# Altium PCB main.PcbDoc
Units mil, origin at the board's own origin, x right, y up, seen from the top; angles counter-clockwise.
Board outline 3110.27 x 3307.12 mil, 2 copper layers (Top Layer, Bottom Layer); 85 components, 80 nets, 350 pads, 74 vias.
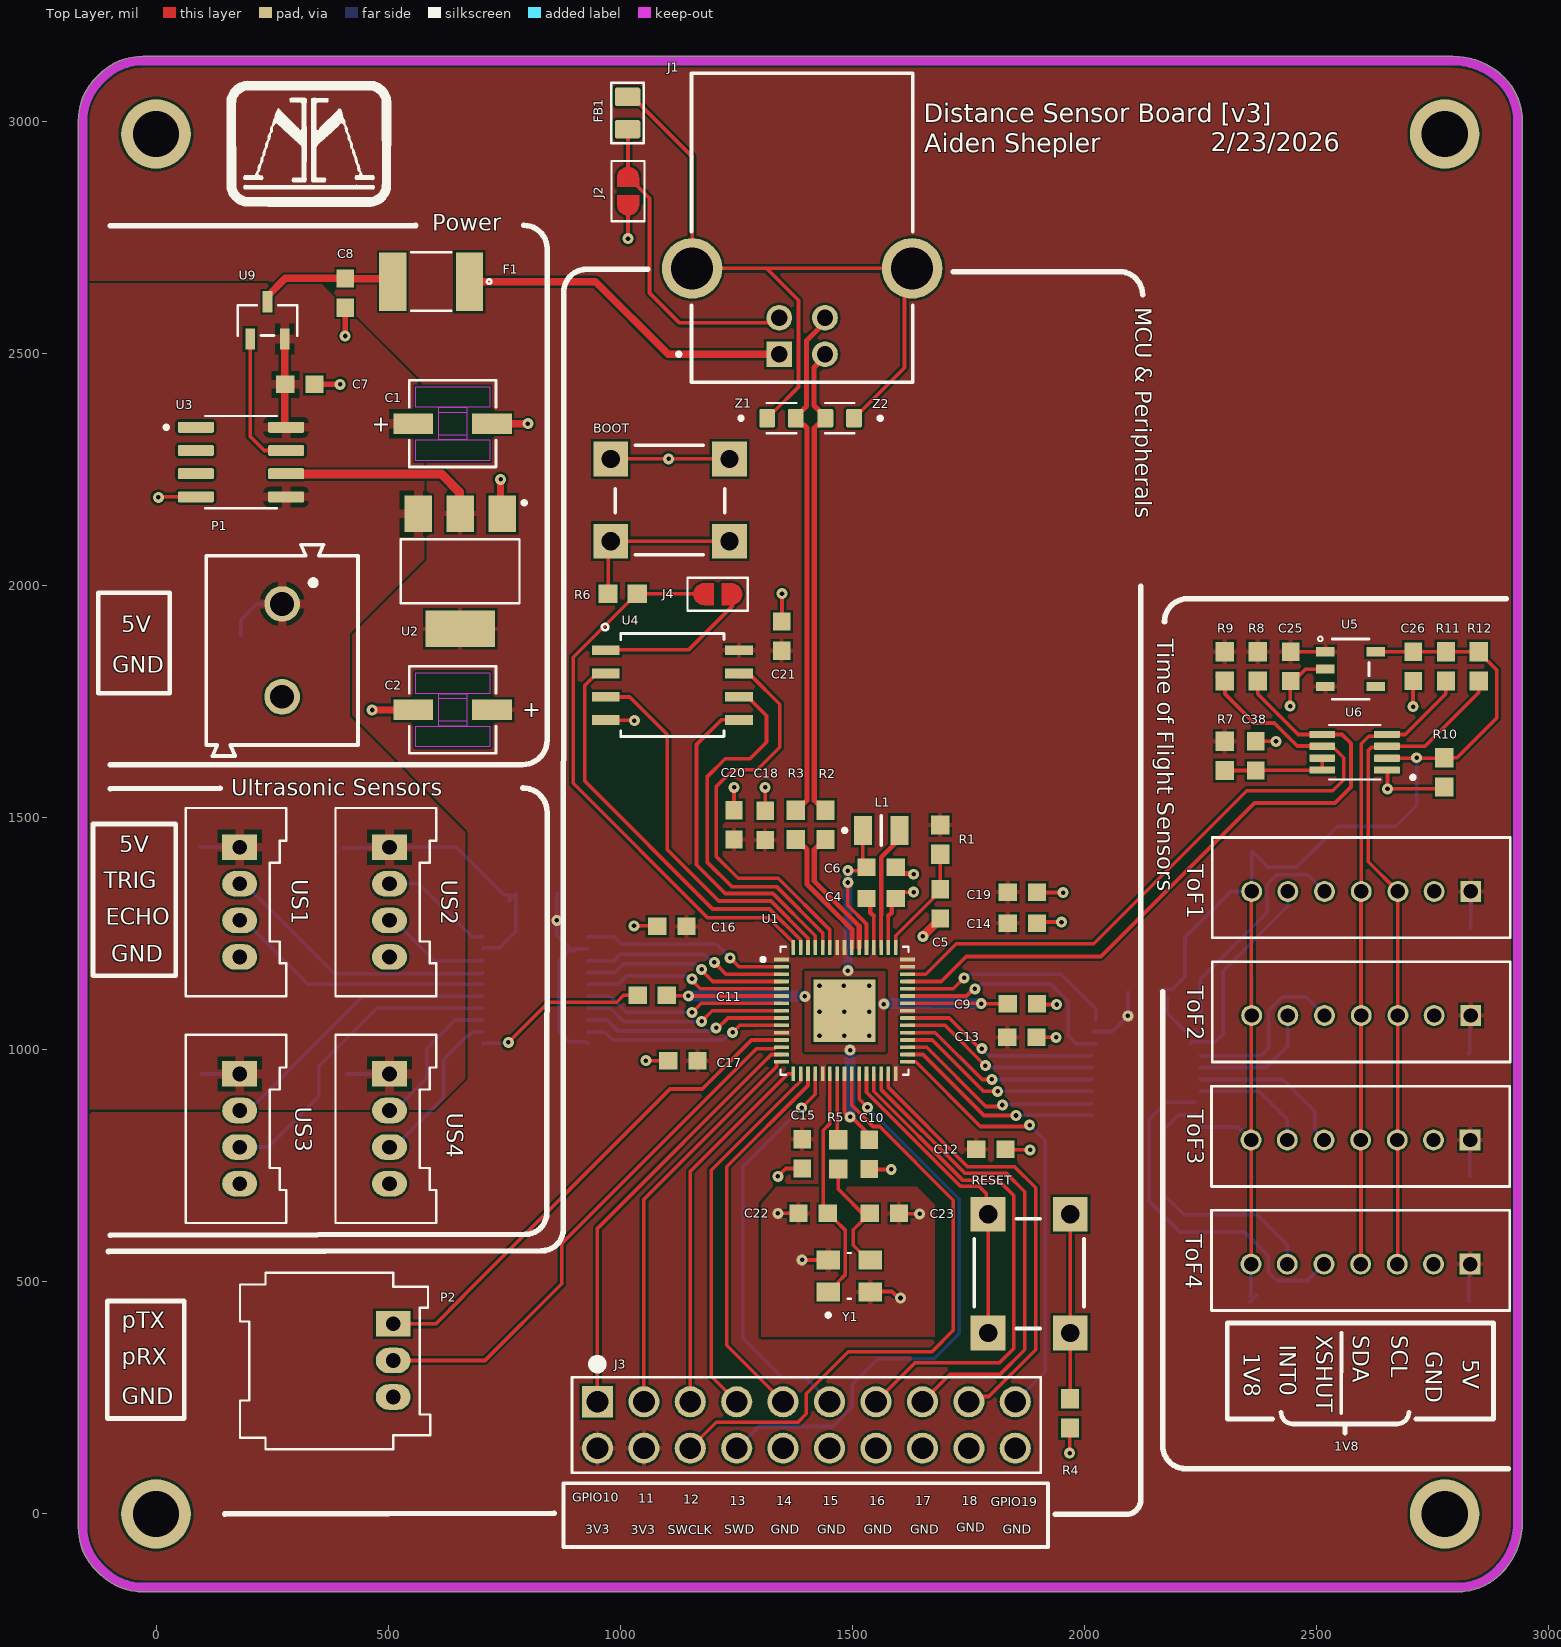
[diagram p0: Top Layer view]
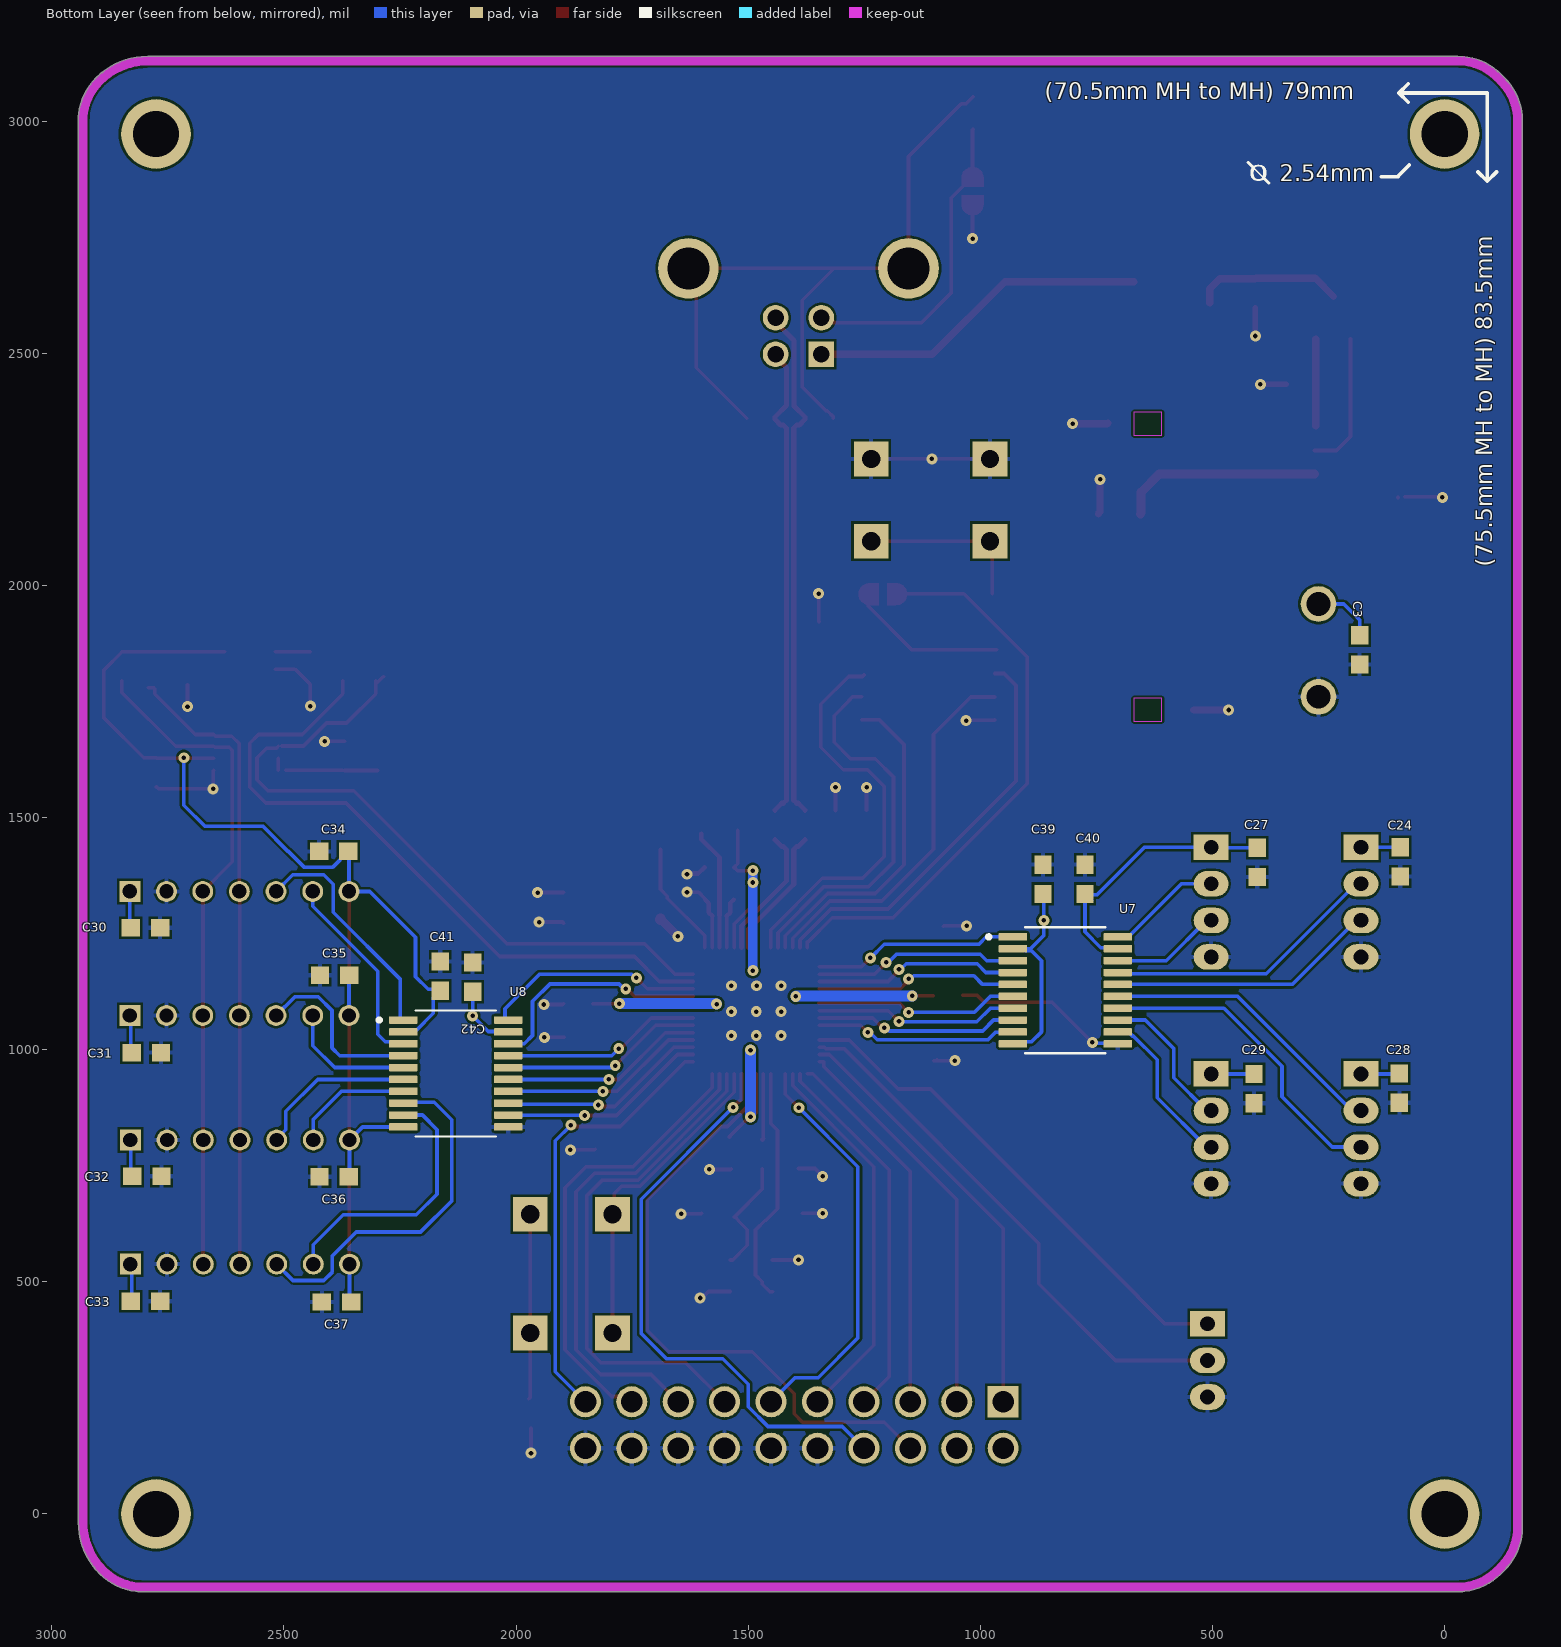
[diagram p1: Bottom Layer view, seen from below]

## Layer stack, top to bottom
Top Solder: solder mask 0.4, Solder Resist, Dk 3.5
Top Layer: signal copper 1.4
Dielectric 1: dielectric 12.6, FR-4, Dk 4.8
Bottom Layer: signal copper 1.4
Bottom Solder: solder mask 0.4, Solder Resist, Dk 3.5

## Board outline
-129.1,-121.07 cw(c-36.77,-28.74) -167.34,-28.74 -167.34,3001.18 cw(c-36.77,3001.18) -129.1,3093.51 -121.07,3101.54 cw(c-28.74,3009.21) -28.74,3139.78 2792.98,3139.78 cw(c2792.98,2981.8) 2904.69,3093.51 cw(c2812.36,3001.18) 2942.11,3015.73 2942.93,3011.81 2942.93,-17.38 cw(c2784.95,-17.38) 2896.66,-129.1 cw(c2804.33,-36.77) 2818.88,-166.52 2814.96,-167.34 -39.37,-167.34 -43.29,-166.52 cw(c-28.74,-36.77) -121.07,-129.1

## Design rules (kind name [scope] priority, off if disabled: settings)
Clearance [All] p1: gap=4.92 ignorepadtopadclearanceinfootprint=FALSE
DiffPairsRouting [All] p1: maxlimit=5 minlimit=5 mostfreqgap=5 toplayer_minwidth=7.87 toplayer_maxwidth=10.91 toplayer_prefwidth=10.91 bottomlayer_minwidth=7.87 bottomlayer_maxwidth=10.91 bottomlayer_prefwidth=10.91 impedanceprofiledriven=TRUE impedanceprofileid={42F0FB0B-BD3A-4B47-9FD5-915A8C1A7547} impedanceprofilevalue=90.000000 maxuncoupledlength=500
MinimumSolderMaskSliver [All] p1: minsoldermaskwidth=4.92
PlaneClearance [InNet('NetFB1_1')] p1: clearance=4.92
PlaneClearance PlaneClearance_1 [All] p2: clearance=4.92
PolygonConnect Polygon_5V_Connect [IsNamedPolygon('T.5V')] p1: connectstyle=Relief reliefconductorwidth=19.68 reliefentries=4 polygonreliefangle="90 Angle" airgapwidth=10
PolygonConnect Polygon_1V1-2_Connect_Direct [IsNamedPolygon('T.1V1-2')] p2: connectstyle=Direct reliefconductorwidth=10 reliefentries=4 polygonreliefangle="90 Angle" airgapwidth=10
PolygonConnect Polygon_3V3-1_Connect_Direct [IsNamedPolygon('T.3V3-1')] p3: connectstyle=Direct reliefconductorwidth=10 reliefentries=4 polygonreliefangle="90 Angle" airgapwidth=10
PolygonConnect Polygon_3V3-2/GND-12/1V1-1_Connect_Relief90 [IsNamedPolygon('T.1V1-1') or IsNamedPolygon('T.GND-1') or IsNamedPolygon('B.GND-1') or IsNamedPolygon('T.3V3-2') vs (IsThruPin or IsSMTPin or IsPad or IsComponentPad)] p4: connectstyle=Relief reliefconductorwidth=10 reliefentries=4 polygonreliefangle="90 Angle" airgapwidth=4.92
PolygonConnect Polygon_3V3-2/GND-12/1V1-1_Connect_Direct [IsNamedPolygon('T.1V1-1') or IsNamedPolygon('T.GND-1') or IsNamedPolygon('T.3V3-2') or IsNamedPolygon('B.GND-1') vs IsVia] p5: connectstyle=Direct reliefconductorwidth=10 reliefentries=4 polygonreliefangle="90 Angle" airgapwidth=10
RoutingVias [All] p1: holewidth=28 width=50 viastyle="Through Hole" minholewidth=7.87 minwidth=13.78 maxholewidth=28 maxwidth=50
SilkToSilkClearance [All] p1: silktosilkclearance=4.92
SilkToSolderMaskClearance [IsPad] p1: minsilkscreentomaskgap=4.92 clearancetoexposedcopper=TRUE
SolderMaskExpansion [All] p1: expansion=4 istentingtop=FALSE
SupplyNets "Schematic Supply Nets_4" [InNet('1V1')] p1: voltage=0.000
SupplyNets "Schematic Supply Nets_3" [InNet('1V8')] p2: voltage=0.000
SupplyNets "Schematic Supply Nets_2" [InNet('5V')] p3: voltage=0.000
SupplyNets "Schematic Supply Nets_1" [InNet('GND')] p4: voltage=0.000
SupplyNets "Schematic Supply Nets" [InNet('3V3')] p5: voltage=0.000
Width [All] p1: maxlimit=23.62 minlimit=7.87 preferedwidth=7.87
25 further rules are at their usual default settings.

## Classes and differential pairs
component class MCU: ` BOOT C1 C2 C3 C4 C5 C6 C7 C8 C9 C10 C11 C12 C13 C14 C15 C16 C17 C18 C19 C20 C21 C22 C23 F1 FB1 J1 J2 J3 J4 L1 P1 P2 R1 R2 R3 R4 R5 R6 RESET U1 U2 U3 U4 U9 Y1 Z1 Z2
component class Distance-Sensors: C24 C25 C26 C27 C28 C29 C30 C31 C32 C33 C34 C35 C36 C37 C38 C39 C40 C41 C42 R7 R8 R9 R10 R11 R12 ToF1 ToF2 ToF3 ToF4 U5 U6 U7 U8 US1 US2 US3 US4
differential pair DX: +DX_P -DX_N
differential pair D: +D_P -D_N

## Components (designator, comment, footprint, x,y, rotation, side; value= is the part's Value field where it differs from the comment)
BOOT "BOOT" SPST-PUSH-BUTTON 1107.28,2184.06 r90 top (schematic designator B2)
C1 "10uF" RADIAL_CAN_CAP_4_X_5.8_SMD 639.13,2348.43 r0 top
C2 "10uF" RADIAL_CAN_CAP_4_X_5.8_SMD 639.13,1732.28 r180 top
C3 "Cap" CAPC0603 183.07,1861.22 r270 bottom value=100nF
C4 "Cap" CAPC0603 1562.01,1325.79 r0 top value=4.7uF
C5 "Cap" CAPC0603 1688.98,1313.98 r270 top value=4.7uF
C6 "Cap" CAPC0603 1562.01,1392.72 r0 top value=4.7uF
C7 "Cap" CAPC0603 310.04,2433.07 r0 top value=100nF
C8 "Cap" CAPC0603 407.48,2629.92 r90 top value=100nF
C9 "Cap" CAPC0603 1866.14,1099.41 r0 top value=100nF
C10 "Cap" CAPC0603 1536.42,774.61 r270 top value=4.7uF
C11 "Cap" CAPC0603 1068.9,1117.13 r180 top value=100nF
C12 "Cap" CAPC0603 1798.23,785.43 r0 top value=100nF
C13 "Cap" CAPC0603 1865.16,1026.57 r0 top value=100nF
C14 "Cap" CAPC0603 1866.14,1272.64 r0 top value=100nF
C15 "Cap" CAPC0603 1391.73,775.59 r270 top value=100nF
C16 "Cap" CAPC0603 1111.22,1265.75 r180 top value=100nF
C17 "Cap" CAPC0603 1134.84,976.38 r180 top value=100nF
C18 "Cap" CAPC0603 1312.01,1483.27 r90 top value=100nF
C19 "Cap" CAPC0603 1866.14,1339.57 r0 top value=100nF
C20 "Cap" CAPC0603 1245.08,1484.25 r90 top value=100nF
C21 "Cap" CAPC0603 1347.44,1890.75 r90 top value=100nF
C22 "Cap" CAPC0603 1415.35,647.64 r180 top value=15pF
C23 "Cap" CAPC0603 1568.9,647.64 r0 top value=15pF
C24 "Cap" CAPC0603 95.47,1404.53 r270 bottom value=100nF
C25 "Cap" CAPC0603 2443.9,1825.79 r270 top value=1uF
C26 "Cap" CAPC0603 2707.68,1825.79 r270 top value=1uF
C27 "Cap" CAPC0603 403.54,1403.54 r270 bottom value=100nF
C28 "Cap" CAPC0603 97.44,917.32 r270 bottom value=100nF
C29 "Cap" CAPC0603 410.43,916.34 r270 bottom value=100nF
C30 "Cap" CAPC0603 2798.23,1262.8 r180 bottom value=100nF
C31 "Cap" CAPC0603 2796.5,993.66 r180 bottom value=100nF
C32 "Cap" CAPC0603 2795.28,727.36 r180 bottom value=100nF
C33 "Cap" CAPC0603 2798.23,458.23 r180 bottom value=100nF
C34 "Cap" CAPC0603 2392.72,1427.17 r0 bottom value=100nF
C35 "Cap" CAPC0603 2390.75,1160.43 r0 bottom value=100nF
C36 "Cap" CAPC0603 2391.73,726.38 r0 bottom value=100nF
C37 "Cap" CAPC0603 2386.81,456.69 r0 bottom value=100nF
C38 "Cap" CAPC0603 2369.09,1632.87 r90 top value=100pF
C39 "Cap" CAPC0603 865.16,1367.13 r270 bottom value=100nF
C40 "Cap" CAPC0603 774.61,1367.13 r90 bottom value=100nF
C41 "Cap" CAPC0603 2163.39,1158.46 r270 bottom value=100nF
C42 "Cap" CAPC0603 2093.5,1156.5 r270 bottom value=100nF
F1 "MF-MSMF050-2" FUSM4632X85 592.52,2654.53 r180 top
FB1 "MH2029-300Y" L0805 1015.75,3017.72 r270 top
J1 "USB-B" SAMTEC_USB-B-S-X-X-TH 1391.73,2683.07 r180 top
J2 "Thru-Hole Jumper" "[Jumper] Solderable Jumper" 1016.73,2849.41 r270 top
J3 "[Connector] 879142016" "[Connector] CONN20" 950.79,241.73 r0 top
J4 "Thru-Hole Jumper" "[Jumper] Solderable Jumper" 1209.84,1981.3 r0 top
L1 "3.3uH" 2016_SMD_Inductor 1562.01,1472.44 r0 top
P1 "2 port screw" "[CONNECTOR] 5MM_2PORT_SCREW" 271.65,1860.24 r270 top
P2 "UART" MOLEX-HDR-1X3-SHERLOCK-RA 510.83,409.45 r90 top
R1 "Res" RES0603 1688.98,1452.76 r270 top value=33
R2 "Res" RES0603 1441.93,1484.25 r270 top value=27
R3 "Res" RES0603 1377.95,1484.25 r270 top value=27
R4 "Res" RES0603 1968.5,216.54 r90 top value=1k
R5 "Res" RES0603 1469.49,774.61 r90 top value=1k
R6 "Res" RES0603 1004.92,1982.28 r0 top value=1k
R7 "Res" RES0603 2302.17,1632.87 r270 top value=200k
R8 "Res" RES0603 2373.03,1825.79 r270 top value=1k
R9 "Res" RES0603 2302.17,1825.79 r270 top value=1k
R10 "Res" RES0603 2774.61,1597.44 r270 top value=300k
R11 "Res" RES0603 2778.54,1825.79 r270 top value=1k
R12 "Res" RES0603 2849.41,1825.79 r270 top value=1k
RESET "BOOT" SPST-PUSH-BUTTON 1880.91,517.72 r0 top (schematic designator B1)
ToF1 "ToF 1" 7POS_2MM_CONN 2831.99,1340.98 r0 top
ToF2 "ToF 2" 7POS_2MM_CONN 2831.99,1073.62 r0 top
ToF3 "ToF 3" 7POS_2MM_CONN 2830.7,805.55 r0 top
ToF4 "ToF 4" 7POS_2MM_CONN 2830.7,538.19 r0 top
U1 "[MCU] RP2350" QFN40P700X700X90-61N 1483.06,1084.09 r0 top
U2 "NCP1117LPST33T3G" SOT230P700X175-4N 655.15,2030.51 r270 top
U3 "LMV358IDR" SOIC-8 183.07,2265.75 r0 top
U4 "W25Q128JVSIQ TR" SOIC_208MIL_WIN 1112.2,1785.43 r0 top
U5 "ADPL40502AUJZ-1.8-R7" TSOT-23-5_UJ-5_ADI 2572.95,1819.88 r0 top
U6 "PCA9306DCTR" SOP65P400X130-8N 2581.69,1640.75 r180 top
U7 "[IC] TXS0108EQPWRQ1" SOP65P640X120-20N 816.93,1127.95 r180 bottom
U8 "[IC] TXS0108EQPWRQ1" SOP65P640X120-20N 2129.92,948.82 r180 bottom
U9 "PMV48XP,215" SOT23_NEX 240.16,2570.87 r0 top
US1 "USS1" MOLEX-HDR-1X4-SHERLOCK-VERT 180.12,1436.02 r90 top
US2 "USS2" MOLEX-HDR-1X4-SHERLOCK-VERT 502.95,1436.02 r90 top
US3 "USS3" MOLEX-HDR-1X4-SHERLOCK-VERT 180.12,947.84 r90 top
US4 "USS4" MOLEX-HDR-1X4-SHERLOCK-VERT 502.95,947.84 r90 top
Y1 "ABM8-272-T3" XTAL_ABM8-272-T3 1493.11,512.8 r90 top
Z1 "VAR" VARC1608X56N 1347.24,2360.24 r0 top
Z2 "VAR" VARC1608X56N 1472.64,2360.24 r180 top

## Footprints (in the part's own frame and the unit in brackets; to place one, negate y for a bottom-side part, rotate by r counter-clockwise, add the part's x,y. Pads: shape width x height; smd on the part's side, far side on the other; paste and mask are expansions set on the pad)
7POS_2MM_CONN [mil]
  rect 45x45 / inner round 45 / far side rect 45x45 hole 31: 1(0,0)
  round 45 hole 31: 2(-79,0) 3(-157,0) 4(-236,0) 5(-315,0) 6(-394,0) 7(-472,0)
  silkscreen extent -557,-100 85,116, body extent -556,-100 86,118, height 337
2016_SMD_Inductor [mm] "0806 (2016 Metric)"
  rect 1x1.6 smd: 1(-1,0) 2(1,0)
  silkscreen extent -2.1,-0.8 0,0.8, body extent -1,-0.8 1,0.8, height 0.95
"[CONNECTOR] 5MM_2PORT_SCREW" [mm] "5.08 mm pitch 2 port screw terminal / 691213510002"
  round 1.95 hole 1.3: 1(-2.54,0) 2(2.54,0)
  silkscreen extent -5.78,-4.15 5.78,4.15, body extent -5.68,-4.04 5.68,4.06, height 10
"[Connector] CONN20" [mil]
  rect 67x67 / inner round 67 / far side rect 67x67 hole 47: 1(0,0)
  round 67 hole 47: 2(0,-100) 3(100,0) 4(100,-100) 5(200,0) 6(200,-100) 7(300,0) 8(300,-100) 9(400,0) 10(400,-100) 11(500,0) 12(500,-100) 13(600,0) 14(600,-100) 15(700,0) 16(700,-100) 17(800,0) 18(800,-100) 19(900,0) 20(900,-100)
  silkscreen extent -55,-153 955,91, body extent -50,-151 950,45, height 325
"[Jumper] Solderable Jumper" [mil]
  round 1 smd: 1(-30.71,0) 2(30.71,0)
  Top Layer region: 8.9,-23.62 8.9,23.62 28.9,23.62 28.9,23.62 39.15,21.28 47.37,14.73 51.93,5.26 51.93,-5.26 47.37,-14.73 39.15,-21.28 28.9,-23.62 28.9,-23.62
  Top Layer region: -8.9,-23.62 -8.9,23.62 -28.9,23.62 -28.9,23.62 -39.15,21.28 -47.37,14.73 -51.93,5.26 -51.93,-5.26 -47.37,-14.73 -39.15,-21.28 -28.9,-23.62 -28.9,-23.62
  silkscreen extent -65,-35 65,35
CAPC0603 [mm] "Chip Capacitor, 2-Leads, Body 1.60x0.80mm, IPC Medium Density"
  rect 1x0.95 smd: 1(-0.8,0) 2(0.8,0)
  body extent -0.88,-0.48 0.87,0.48, height 0.8
FUSM4632X85 [mm]
  rect 1.5x3.2 smd: 1(-2.1,0) 2(2.1,0)
  silkscreen extent -3.3,-1.6 1.1,1.6, body extent -2.27,-1.62 2.27,1.62, height 1.1
L0805 [mil]
  rrect25% 40x55 smd: 1(-35,0) 2(35,0)
  silkscreen extent -65,-35 65,35, body extent -39,-24 39,24, height 43
MOLEX-HDR-1X3-SHERLOCK-RA [mm]
  rect 1.397x1.905 hole 0.8: 1(0,0)
  oval 1.397x1.905 hole 0.8: 2(-2,0) 3(-4,0)
  silkscreen extent -6.86,-2.03 2.79,8.38, body extent -6.88,-1.99 2.82,8.51, height 5.75
MOLEX-HDR-1X4-SHERLOCK-VERT [mm]
  rect 1.397x1.905 hole 0.8: 1(0,0)
  oval 1.397x1.905 hole 0.8: 2(-2,0) 3(-4,0) 4(-6,0)
  silkscreen extent -8.15,-2.55 2.15,2.95, body extent -8.13,-2.57 2.17,2.98, height 8.5
QFN40P700X700X90-61N [mm] "RP2350"
  rrect25% 0.81x0.2 smd paste+0 mask+0.102: 1(-3.45,2.8) 2(-3.45,2.4) 3(-3.45,2) 4(-3.45,1.6) 5(-3.45,1.2) 6(-3.45,0.8) 7(-3.45,0.4) 8(-3.45,0) 9(-3.45,-0.4) 10(-3.45,-0.8) 11(-3.45,-1.2) 12(-3.45,-1.6) 13(-3.45,-2) 14(-3.45,-2.4) 15(-3.45,-2.8) 31(3.45,-2.8) 32(3.45,-2.4) 33(3.45,-2) 34(3.45,-1.6) 35(3.45,-1.2) 36(3.45,-0.8) 37(3.45,-0.4) 38(3.45,0) 39(3.45,0.4) 40(3.45,0.8) 41(3.45,1.2) 42(3.45,1.6) 43(3.45,2) 44(3.45,2.4) 45(3.45,2.8)
  rrect25% 0.2x0.81 smd paste+0 mask+0.102: 16(-2.8,-3.45) 17(-2.4,-3.45) 18(-2,-3.45) 19(-1.6,-3.45) 20(-1.2,-3.45) 21(-0.8,-3.45) 22(-0.4,-3.45) 23(0,-3.45) 24(0.4,-3.45) 25(0.8,-3.45) 26(1.2,-3.45) 27(1.6,-3.45) 28(2,-3.45) 29(2.4,-3.45) 30(2.8,-3.45) 46(2.8,3.45) 47(2.4,3.45) 48(2,3.45) 49(1.6,3.45) 50(1.2,3.45) 51(0.8,3.45) 52(0.4,3.45) 53(0,3.45) 54(-0.4,3.45) 55(-0.8,3.45) 56(-1.2,3.45) 57(-1.6,3.45) 58(-2,3.45) 59(-2.4,3.45) 60(-2.8,3.45)
  rect 3.4x3.4 smd paste-0.62 mask+0.102: 61(0,0)
  silkscreen extent -4.56,-3.5 3.5,3.5, body extent -3.55,-3.55 3.55,3.55, height 0.96
RADIAL_CAN_CAP_4_X_5.8_SMD [mil]
  rect 86x45 smd paste+0 mask+0: 1(-85,0) 2(85,0)
  Top Layer keep-out region: -30,-35 -30,35 30,35 30,-35
  Top Layer keep-out region: -80,-80 -80,-35 80,-35 80,-80
  Top Layer keep-out region: -80,35 -80,80 80,80 80,35
  Keep-Out Layer region: -30,-24.5 -30,24.5 30,24.5 30,-24.5
  silkscreen extent -94,-94 94,94, body extent -108,-89 108,89, height 242
RES0603 [mm] "Chip Resistor, 2-Leads, Body 1.60x0.80mm, IPC Medium Density"
  rect 1.05x1 smd: 1(-0.8,0) 2(0.8,0)
  body extent -0.88,-0.48 0.87,0.47, height 0.8
SAMTEC_USB-B-S-X-X-TH [mm]
  rect 1.408x1.408 / inner round 1.408 / far side rect 1.408x1.408 hole 0.9: 1(1.25,4.7)
  round 1.408 hole 0.9: 2(-1.25,4.7) 3(-1.25,2.7) 4(1.25,2.7)
  round 3.316 hole 2.3: S1(-6.02,0) S2(6.02,0)
  silkscreen extent -6.05,-10.67 6.85,6.22, body extent -7.25,-10.39 7.25,6.11, height 10.7
SOIC-8 [mm] "127P599X175-8N"
  rrect25% 1.97x0.6 smd: 1(-2.47,1.905) 2(-2.47,0.635) 3(-2.47,-0.635) 4(-2.47,-1.905) 5(2.47,-1.905) 6(2.47,-0.635) 7(2.47,0.635) 8(2.47,1.905)
  silkscreen extent -4.19,-2.52 1.95,2.52, body extent -3,-2.45 3,2.45, height 1.75
SOIC_208MIL_WIN [mil]
  rect 60x21 smd paste+0 mask+0: 1(-143.5,75) 2(-143.5,25) 3(-143.5,-25) 4(-143.5,-75) 5(143.5,-75) 6(143.5,-25) 7(143.5,25) 8(143.5,75)
  silkscreen extent -152,-111 111,132, body extent -159,-106 159,106, height 85
SOP65P400X130-8N [mm]
  rrect25% 1.42x0.4 smd: 1(-1.77,0.975) 2(-1.77,0.325) 3(-1.77,-0.325) 4(-1.77,-0.975) 5(1.77,-0.975) 6(1.77,-0.325) 7(1.77,0.325) 8(1.77,0.975)
  silkscreen extent -3.29,-1.5 1.4,1.5, body extent -2,-1.47 2,1.47, height 1.3
SOP65P640X120-20N [mm]
  rrect25% 1.57x0.41 smd: 1(-2.87,2.925) 2(-2.87,2.275) 3(-2.87,1.625) 4(-2.87,0.975) 5(-2.87,0.325) 6(-2.87,-0.325) 7(-2.87,-0.975) 8(-2.87,-1.625) 9(-2.87,-2.275) 10(-2.87,-2.925) 11(2.87,-2.925) 12(2.87,-2.275) 13(2.87,-1.625) 14(2.87,-0.975) 15(2.87,-0.325) 16(2.87,0.325) 17(2.87,0.975) 18(2.87,1.625) 19(2.87,2.275) 20(2.87,2.925)
  silkscreen extent -4.29,-3.45 2.2,3.45, body extent -3.2,-3.25 3.2,3.25, height 1.2
SOT23_NEX [mil] "TO-236 (PMOS)"
  rect 21x46 smd paste+0 mask+0: 1(-37.4,-40) 2(37.4,-40) 3(0,40)
  silkscreen extent -64,-32 64,32, body extent -59,-49 59,49, height 43
SOT230P700X175-4N [mm]
  rect 2x1.5 smd: 1(-3.15,2.3) 2(-3.15,0) 3(-3.15,-2.3)
  rect 2x3.8 smd: 4(3.15,0)
  silkscreen extent -3.85,-3.25 1.75,3.6, body extent -3.5,-3.25 3.5,3.25, height 1.8
SPST-PUSH-BUTTON [mm] "1825910-6"
  rect 1.9x1.9 hole 1: 1(2.25,3.25) 2(2.25,-3.25) 3(-2.25,-3.25) 4(-2.25,3.25)
  silkscreen extent -3,-3 3,3, body extent -3,-4 2.99,3.8, height 5.11
TSOT-23-5_UJ-5_ADI [mil] "SOT23_5, Thin"
  rect 39.5x20 smd paste+0 mask+0: 1(-54.25,37.4) 2(-54.25,0) 3(-54.25,-37.4) 4(54.25,-37.4) 5(54.25,37.4)
  silkscreen extent -70,-65 40,70, body extent -60,-60 60,60, height 39
VARC1608X56N [mm]
  rrect25% 0.87x1.02 smd: 1(-0.78,0) 2(0.78,0)
  silkscreen extent -2.31,-0.83 0.8,0.83, body extent -0.8,-0.4 0.8,0.4, height 0.33
XTAL_ABM8-272-T3 [mm]
  rect 1.05x1.3 smd: 1(-0.875,1.15) 2(-0.875,-1.15) 3(0.875,-1.15) 4(0.875,1.15)
  silkscreen extent -2.24,-0.09 1.25,1.25, body extent -1.25,-1.6 1.25,1.6, height 0.7

## Part data
BOOT RESET: library part 1825910-6, "SWITCH TACTILE SPST-NO 0.05A 24V", Contact Current Rating=50mA, Contact Resistance=100mR, Manufacturer="TE Connectivity Alcoswitch", Max Operating Temperature=85°C, Max Voltage Rating (DC)=24V, Min Operating Temperature=-35°C, Operating Force=160gf, Package Quantity=750, Supplier Part Number 1=450-1650-ND, Actuator Length=0.055inch, Actuator Material=PBT, Actuator Type=Standard, Category="Pushbutton Switches", ComponentLink1Description=https://datasheet.ciiva.com/30199/1825910-6rqpn1825910-6-30199520.pdf?src-supplier=Onlinecomponents.com, ComponentLink1URL=https://datasheet.ciiva.com/30199/1825910-6rqpn1825910-6-30199520.pdf?src-supplier=Onlinecomponents.com, ComponentLink2Description=https://datasheet.ciiva.com/15184/getdatasheetpartid-395915-15184509.pdf?src-supplier=Verical, ComponentLink2URL=https://datasheet.ciiva.com/15184/getdatasheetpartid-395915-15184509.pdf?src-supplier=Verical, Contact Material="Copper Alloy", Contact Plating=Silver, Electrical Life=100000Cycles, ELV=Compliant, Illumination Type=Non-Illuminated,Illuminated, Lead Free="Lead Free", Length=5.99mm, Manufacturer Part Number=1825910-6, Max Current Rating=50mA, Mechanical Life=100000Cycles, Mount="Through Hole", Orientation=Straight, Packaging="Loose Piece", Pricing 1="1=0,10000, 10=0,10100, 25=0,09560, 100=0,08700, 250=0,08180, 500=0,07484, 1000=0,06265, 2500=0,06092, 5000=0,05743 (USD)", REACH SVHC=Unknown, RoHS=Yes, Stock 1=97530, Supplier 1=Digi-Key, Switch Function=Off-Mom, Switch Travel=0.25mm, Termination="PC Pins", Throw Configuration=SPST, Type=Switch
C1 C2: library part EEE-FK1E100R, "10uF electrolytic cap, radial can, SMD", Manufacturer_Name=Panasonic, Copyright="Copyright (C) 2025 Ultra Librarian. All rights reserved.", Manufacturer_Part_Number=EEE-FK1E100R
C3 C4 C5 C6 C7 C8 C9 C10 C11 C12 C13 C14 C15 C16 C17 C18 C19 C20 C21 C22 C23 C24 C25 C26 C27 C28 C29 C30 C31 C32 C33 C34 C35 C36 C37 C38 C39 C40 C41 C42: Supplier Part Number 1=1276-1000-1-ND, Supplier 1=Digi-Key
F1: "[Fuse] Polymeric PTC Resettable Fuse 15V 500 mA Ih Surface Mount 1812 (4532 Metric), Concave", Package="1812 Bourns", Availability="In Stock", Check_prices=https://www.snapeda.com/parts/MF-MSMF050-2/Bourns+-+J.W.+Miller/view-part/?ref=eda, MF=Bourns, MP=MF-MSMF050-2, Price=None, Purchase-URL=https://pricing.snapeda.com/search/part/MF-MSMF050-2/?ref=eda, SnapEDA_Link=https://www.snapeda.com/parts/MF-MSMF050-2/Bourns+-+J.W.+Miller/view-part/?ref=snap
FB1: "[Inductor] Ferrite Bead Bourns MH2029-300Y / SMD-FERRITE-BEAD-30R-3A(0805)", Package="0805 Bourns", Check_prices=https://www.snapeda.com/parts/MH2029-300Y/Bourns/view-part/?ref=eda, MF=Bourns, MP=MH2029-300Y, SnapEDA_Link=https://www.snapeda.com/parts/MH2029-300Y/Bourns/view-part/?ref=snap
J1: library part USB-B-S-X-X-TH, "USB-B (USB TYPE-B) USB 2.0 Receptacle Connector 4 Position Through Hole, Right Angle", Package=None, Check_prices=https://www.snapeda.com/parts/USB-B-S-F-W-TH-TR/Samtec/view-part/?ref=eda, MF=Samtec, MP=USB-B-S-F-W-TH-TR, SnapEDA_Link=https://www.snapeda.com/parts/USB-B-S-F-W-TH-TR/Samtec/view-part/?ref=snap
J2 J4: library part "[Jump] Thru-Hole 2pin", "Clip Jumper", NO/NC=NC
J3: "2x10 2.54mm pitch header", Package=None, Availability=Unavailable, MP=879142016, Price=None
L1: library part "INDUCTOR 3.3uH", "Power Inductors - SMD IND 3.3uH used for RP2350 VREG", Manufacturer_Name=ABRACON, Manufacturer_Part_Number=AOTA-B201610S3R3-101-T, Mouser Part Number=815-AB201610S3R3101T, Datasheet Link=https://abracon.com/datasheets/AOTA-B201610S3R3-101-T.pdf, Geometry.Height=1mm, Mouser Price/Stock=https://www.mouser.co.uk/ProductDetail/ABRACON/AOTA-B201610S3R3-101-T?qs=%252BXxaIXUDbq0IZvJW%2F2mv4w%3D%3D
P1: library part "[Connector] 691213510002", "2 Position Wire to Board Terminal Block Horizontal with Board 0.200 (5.08mm) Through Hole", Package=None, Check_prices=https://www.snapeda.com/parts/691213510002/W%25C3%25BCrth+Elektronik+Midcom/view-part/?ref=eda, MF="WÃ¼rth Elektronik", MP=691213510002, SnapEDA_Link=https://www.snapeda.com/parts/691213510002/W%25C3%25BCrth+Elektronik+Midcom/view-part/?ref=snap
P2: library part MOLEX-HDR-1x3-SHERLOCK_RA, "Header, Molex, 2mm Pitch Sherlock Header, Single Row, Right Angle 3 Circuits, Length 3.3mm", Manufacturer="Molex Connector Corporation", Manufacturer Part Number=35363-0360, Supplier Part Number 1=WM18932-ND, Supplier 1=Digi-Key
R1 R2 R3 R4 R5 R6 R7 R8 R9 R10 R11 R12: "SMD, RES0603", Supplier Part Number 1=RMCF0603JT10K0CT-ND, Supplier 1=Digi-Key
ToF1 ToF2 ToF3 ToF4: library part MOLEX_SHERLOCK_1x7_CONN, "1x7 2mm pitch sherlock connector", Package=None, Availability=Unavailable, MP=353620750, Price=None
U1: library part SC1509(13), "RP2350A MCU from Raspberry Pi Pico; QFN 60 7x7,", Package=None, Check_prices=https://www.snapeda.com/parts/SC1509-A4/Raspberry+Pi/view-part/?ref=eda, MF="Raspberry Pi", MP=SC1509-A4, SnapEDA_Link=https://www.snapeda.com/parts/SC1509-A4/Raspberry+Pi/view-part/?ref=snap
U2: "Linear Voltage Regulator IC Positive Fixed 1 Output 1A SOT-223", Package="SOT-223-4 ON Semiconductor", Check_prices=https://www.snapeda.com/parts/NCP1117LPST33T3G/Onsemi/view-part/?ref=eda, MF="ON Semiconductor", MP=NCP1117LPST33T3G, SnapEDA_Link=https://www.snapeda.com/parts/NCP1117LPST33T3G/Onsemi/view-part/?ref=snap
U3: "[Op-Amp] Dual, 5.5-V, 1-MHz, RRO operational amplifier 8-SOIC -40 to 125", Manufacturer_Name="Texas Instruments", Copyright="Copyright (C) 2025 Ultra Librarian. All rights reserved.", Datasheet=https://www.ti.com/lit/gpn/lmv358, Manufacturer_Part_Number=LMV358IDR, RefDes=RefDes, Type=Type
U4: "IC FLASH 128MBIT SPI/QUAD 8SOIC", Manufacturer_Name=Winbond, Copyright="Copyright (C) 2025 Ultra Librarian. All rights reserved.", Manufacturer_Part_Number="W25Q128JVSIQ TR", RefDes=RefDes, Type=Type
U5: "Low Noise, 200mA, CMOS Linear Regulator (LDO)", Manufacturer_Name="Analog Devices Inc", Copyright="Copyright (C) 2025 Ultra Librarian. All rights reserved.", Manufacturer_Part_Number=ADPL40502AUJZ-1.8-R7, RefDes=RefDes, Type=Type
U6: "2-bit bidirectional 400-kHz I2C/SMBus voltage level translator", Package="SSOP-8 Texas Instruments", Check_prices=https://www.snapeda.com/parts/PCA9306DCTR/Texas+Instruments/view-part/?ref=eda, MF="Texas Instruments", MP=PCA9306DCTR, SnapEDA_Link=https://www.snapeda.com/parts/PCA9306DCTR/Texas+Instruments/view-part/?ref=snap
U7 U8: "Automotive eight-bit bidirectional voltage level shifter for open-drain and push-pull applications", Package="TSSOP-20 Texas Instruments", Check_prices=https://www.snapeda.com/parts/TXS0108EQPWRQ1/Texas+Instruments/view-part/?ref=eda, ComponentLink1Description=DigiKey_Link, ComponentLink1URL=https://www.digikey.com/en/products/detail/texas-instruments/TXS0108EQPWRQ1/5324256?s=N4IgTCBcDaICoA0DKAGAjCgHAUQIoAUB1AJVzRAF0BfIA, MF="Texas Instruments", MP=TXS0108EQPWRQ1, SnapEDA_Link=https://www.snapeda.com/parts/TXS0108EQPWRQ1/Texas+Instruments/view-part/?ref=snap
U9: library part "[PMOS] PMV48XP,215", "MOSFET P-CH 20V 3.5A TO236AB", Manufacturer_Name=Nexperia, Copyright="Copyright (C) 2025 Ultra Librarian. All rights reserved.", Manufacturer_Part_Number=PMV48XP,215
US1 US2 US3 US4: library part MOLEX-HDR-1x4-SHERLOCK_VERT, "Header, Molex, 2mm Pitch Sherlock Header, Single Row, Vertical, 4 Circuits, Length 3.3mm, 0353620450"
Y1: "12 MHz Â±30ppm Crystal 10pF 50 Ohms 4-SMD, No Lead", Package="NON-STANDARD-4 Abracon", Check_prices=https://www.snapeda.com/parts/ABM8-272-T3/Abracon/view-part/?ref=eda, MF=ABRACON, MP=ABM8-272-T3, SnapEDA_Link=https://www.snapeda.com/parts/ABM8-272-T3/Abracon/view-part/?ref=snap
Z1 Z2: library part CG0603MLC-05E, "[Varistor] 1 Circuit Surface Mount, MLCV 0603 (1608 Metric)", Package="0603 Bourns Inc.", Availability="In Stock", Check_prices=https://www.snapeda.com/parts/CG0603MLC-05E/Bourns+-+J.W.+Miller/view-part/?ref=eda, MF=Bourns, MP=CG0603MLC-05E, Price=None, Purchase-URL=https://pricing.snapeda.com/search/part/CG0603MLC-05E/?ref=eda, SnapEDA_Link=https://www.snapeda.com/parts/CG0603MLC-05E/Bourns+-+J.W.+Miller/view-part/?ref=snap

## Free pads (board coordinates)
  round 150 hole 100: MH(0,0) MH(0,2972.44) MH(2775.59,0) MH(2775.59,2972.44)

## Via types
v1: diameter 23.62, hole 9.84, Top Layer to Bottom Layer, tented both sides, 74 vias

## Nets (pads, with @x,y where several pads share a name; then routed paths per layer and width w, separated by ;. In a path a pad name is that pad's centre, name@x,y a point inside that pad or via, vN(x,y) a via of type N, cw(c..) or ccw(c..) an arc to the next point about the centre after c; other vN are vias at no path point)
1V1: C6.1 C9.1 C10.1 C11.1 L1.1 U1.6 U1.23 U1.39 U1.50 | length 1732.9
  Top Layer w7.87: C11.1@1101.38,1116.14 v1(1146.65,1116.14) 1147.2,1115.59 U1.6 ; U1.23 1483.06,864.63 1495.08,852.61 v1@1495.08,849.41 ; v1(1490.16,1360.24) 1490.16,1311.02 1530.3,1270.88 U1.50 ; v1(1490.16,1385.83) 1523.62,1385.83 C6.1 1522.64,1400.59 L1.1 ; v1(1495.08,855.32) 1498.03,855.32 1540.35,812.99 C10.1@1540.35,812.01 ; U1.39 v1@1777.13,1099.84 ; v1(1777.56,1099.41) C9.1
  Bottom Layer w19.68: v1(1490.16,1170.28) v1(1490.16,1360.24) v1(1490.16,1385.83)
  Bottom Layer w23.62: v1(1146.65,1116.14) 1396.65,1116.14 v1(1397.64,1115.16) ; v1(1495.08,855.32) v1(1495.08,999.02) ; v1(1567.91,1098.43) 1568.9,1099.41 v1(1777.56,1099.41)
1V8: C26.1 C34.1 C35.1 C36.1 C37.1 C41.2 R10.1 R11.1 R12.1 ToF1.7 ToF2.7 ToF3.7 ToF4.7 U5.5 U6.2 U8.2 U8.10 | length 2921
  Top Layer w7.87: ToF4.7 2359.35,538.83 2359.35,1340.34 ToF1.7 ; U5.5 C26.1 R12.1 2849.41,1856.3 2887.8,1817.91 2887.8,1714.57 2802.17,1628.94 R10.1 2773.62,1627.95 U6.2
  Bottom Layer w7.87: U8.2 2238.78,1042.52 2214.05,1042.52 2178.15,1078.42 2178.15,1112.2 C41.2 2166.65,1130.23 2189.29,1130.23 2216.54,1157.48 2216.54,1242.13 2315.39,1340.98 ToF1.7 2359.99,1425.94 C34.1 2395.67,1392.72 2455.71,1392.72 2490.16,1427.17 2491.14,1427.17 2545.28,1481.3 2670.28,1481.3 2715.55,1526.57 v1(2715.55,1628.94) ; U8.10@2249.8,833.66 2330.59,833.66 ToF3.7 2358.7,727.91 C36.1 C36.1@2361.22,726.38 ; C37.1 2356.3,456.69 C37.1@2371.06,471.46 ; C37.1@2357.28,468.5 2358.7,469.92 ToF4.7 ; C35.1 2359.99,1159.69 ToF2.7
3V3: C2.1 C4.1 C12.1 C13.1 C14.1 C15.1 C16.1 C17.1 C18.1 C19.1 C20.1 C21.1 C25.1 C30.1 C31.1 C32.1 C33.1 C39.2 C42.2 J3.2 J3.4 R1.1 R7.1 R8.1 R9.1 ToF1.1 ToF2.1 ToF3.1 ToF4.1 U1.1 U1.11 U1.20 U1.30 U1.38 U1.44 U1.45 U1.49 U1.53 U1.54 U2.2 U2.4 U3.6 U4.8 U5.1 U5.3 U7.2 U7.10 U8.19 | length 1530.9
  Top Layer w7.87: U1.49 1546.05,1288.18 ; C25.1 U5.1
  Top Layer w10: C4.1@1531.54,1323.31 1538.77,1316.08 1538.77,1295.46 1546.05,1288.18
  Top Layer w19.68: U3.6@280.31,2239.76 615.13,2239.76 653.8,2201.1 653.8,2155.88 U2.2
  Bottom Layer w7.87: C39.2 863.19,1333.66 v1(863.19,1278.54) 863.19,1246.06 891.73,1217.52 U7.2@907.09,1217.52 ; U7.10 925.79,1016.93 889.57,1016.93 868.11,1038.39 868.11,1191.81 889.68,1213.39 902.95,1213.39 U7.2@907.09,1217.52 ; U7.2 U7.2@907.09,1217.52 ; U8.19 2017.7,1039.16 2059.82,1039.16 v1(2093.5,1072.83) 2093.5,1123.03 C42.2@2094.49,1124.02 ; C33.1@2827.76,458.23 2827.76,535.24 ToF4.1 ; C31.1@2828,991.69 2830.04,993.73 ToF2.1@2830.04,1075.16 ; C32.1@2829.72,727.36 2829.72,804.57 ToF3.1 ; C30.1 2831.99,1265.06 ToF1.1
5V: C1.1 C3.1 C7.1 C24.1 C27.1 C28.1 C29.1 C40.1 P1.1 U2.3 U3.5 U3.8 U7.19 U9.2 US1.1 US2.1 US3.1 US4.1 | length 1186.8
  Top Layer w7.87: U3.8@277.56,2343.5 U3.8
  Top Layer w15.75: U3.8@277.56,2343.5 U9.2
  Bottom Layer w7.87: C24.1 US1.1 ; C28.1 98.42,947.84 US3.1 ; C3.1 183.07,1926.18 217.13,1960.24 P1.1 ; C27.1 501.97,1435.04 US2.1 646.65,1436.02 748.71,1333.97 759.84,1333.97 761.32,1332.49 C40.1@761.32,1323.33 ; C29.1 US4.1 ; U7.19 706.19,1219.77 740.44,1219.77 774.61,1253.94 C40.1 ; C40.1@760.33,1322.34 C40.1@761.32,1323.33 ; C40.1@761.32,1321.36 C40.1@761.32,1323.33 ; C40.1@774.1,1336.11 C40.1@761.32,1323.33
AMP_OUT: U3.7 U9.1 | length 300
  Top Layer w7.87: U9.1 202.76,2320.87 232.87,2290.75 U3.7
D_N: J1.2 R2.1 Z2.2 | length 1028.3
  Top Layer w10.91: J1.2 1440.94,2491.56 1439.67,2491.56 1417.49,2469.38 1417.49,2454.15 1417.49,2387.63 1441.93,2363.19 1441.93,2357.28 1430.26,2345.61 1424.29,2345.61 1417.9,2339.22 1417.9,1537.35 1424.29,1530.96 1427.7,1530.96 1441.93,1516.73 R2.1
D_P: J1.3 R3.1 Z1.2 | length 1112.5
  Top Layer w10.91: R3.1 1377.95,1516.73 1392.18,1530.96 1395.59,1530.96 1401.99,1537.35 1401.99,2339.22 1395.59,2345.61 1389.62,2345.61 1377.95,2357.28 1377.95,2363.19 1401.57,2386.81 1401.57,2447.56 1401.57,2527.88 1440.94,2567.25 J1.3
DX_N: R2.2 U1.51 | length 284.9
  Top Layer w10.91: R2.2 1441.93,1451.77 1427.7,1437.54 1424.29,1437.54 1417.9,1431.15 1417.9,1363.04 1514.76,1266.17 U1.51@1514.76,1219.92
DX_P: R3.2 U1.52 | length 284.9
  Top Layer w10.91: R3.2 1377.95,1451.77 1392.18,1437.54 1395.59,1437.54 1401.99,1431.15 1401.99,1356.45 1498.8,1259.63 U1.52
ECHO_1(3V3): U1.5 U7.5 | length 438.7
  Top Layer w7.87: v1(1154.53,1152.56) 1154.53,1149.09 1172.28,1131.34 U1.5
  Bottom Layer w7.87: U7.5 995.15,1140.75 1013.85,1159.45 1143.38,1159.45 1150.27,1152.56 v1(1154.53,1152.56)
ECHO_1(5V): U7.16 US1.3 | length 580.9
  Bottom Layer w7.87: US1.3 190.12,1278.54 327.91,1140.75 U7.16
ECHO_2(3V3): U1.3 U7.3 | length 440.8
  Top Layer w7.87: v1(1202.76,1187.99) 1227.91,1162.83 U1.3
  Bottom Layer w7.87: U7.3 986.32,1191.93 1000.1,1205.71 1180.78,1205.71 1198.49,1187.99 v1(1202.76,1187.99)
ECHO_2(5V): U7.18 US2.3 | length 236.9
  Bottom Layer w7.87: US2.3 512.95,1278.54 599.57,1191.93 U7.18
ECHO_3(3V3): U1.8 U7.7 | length 439.5
  Top Layer w7.87: v1(1175.2,1061.02) 1198.27,1084.09 U1.8
  Bottom Layer w7.87: U7.7 978.35,1089.57 1007.9,1060.01 1174.19,1060.01 v1(1175.2,1061.02)
ECHO_3(5V): U7.14 US3.3 | length 686.4
  Bottom Layer w7.87: US3.3 242.13,790.35 350.39,898.62 350.39,964.57 475.39,1089.57 U7.14
ECHO_4(3V3): U1.10 U7.9 | length 437.1
  Top Layer w7.87: v1(1242.19,1037.4) 1257.38,1052.6 U1.10
  Bottom Layer w7.87: U7.9 930.99,1037.32 967.6,1037.32 983.27,1021.65 1222.18,1021.65 1237.92,1037.4 v1(1242.19,1037.4)
ECHO_4(5V): U7.12 US4.3 | length 351.6
  Bottom Layer w7.87: US4.3 512.95,790.35 619.09,896.5 619.09,978.27 670.54,1029.72 672.44,1029.72 681.1,1038.39 U7.12
FLASH_SS: J4.2 U4.1 | length 315.4
  Top Layer w7.87: U4.1@965.26,1861.22 1147.05,1861.22 1241.54,1955.71
GND: BOOT.1 BOOT.2 C1.2 C2.2 C3.2 C4.2 C5.2 C6.2 C7.2 C8.1 C9.2 C10.2 C11.2 C12.2 C13.2 C14.2 C15.2 C16.2 C17.2 C18.2 C19.2 C20.2 C21.2 C22.2 C23.2 C24.2 C25.2 C26.2 C27.2 C28.2 C29.2 C30.2 C31.2 C32.2 C33.2 C34.2 C35.2 C36.2 C37.2 C38.2 C39.1 C40.2 C41.1 C42.1 J2.2 J3.10 J3.12 J3.14 J3.16 J3.18 J3.20 P1.2 P2.3 R4.1 R10.2 ToF1.2 ToF2.2 ToF3.2 ToF4.2 U1.47 U1.61 U2.1 U3.4 U4.4 U5.2 U6.1 U7.11 U8.11 US1.4 US2.4 US3.4 US4.4 Y1.2 Y1.4 | length 2719.4
  Top Layer w7.87: v1@4.92,2190.75 U3.4 ; U3.4@100.39,2188.98 U3.4@100.39,2189.76 ; C1.2 C1.2@725.12,2349.41 ; v1(758.86,1015.75) 845.47,1102.36 992.33,1102.36 1007.1,1117.13 C11.2 ; U4.4 969.59,1709.55 1029.63,1709.55 v1(1030.51,1708.66) ; BOOT.1 v1(1104.33,2272.64) BOOT.2 ; v1(1016.73,2747.05) J2.2 ; v1(1029.53,1266.73) 1078.74,1266.73 C16.2 ; v1(1055.03,976.47) C17.2@1100.49,976.47 ; C17.2@1092.61,977.45 C17.2@1093.5,978.35 ; C20.2 v1(1245.08,1564.96) ; C18.2 v1(1312.01,1564.96) ; v1(1339.57,647.64) C22.2 ; v1(1339.57,727.36) 1356.3,744.09 C15.2 ; C21.2 1348.43,1923.23 v1(1348.43,1982.28) ; v1(1391.73,547.24) Y1.4 ; C10.2 1537.4,742.13 v1(1583.66,742.13) ; Y1.2 1539.22,479.18 1585.45,479.18 1599.33,465.31 v1(1603.59,465.31) ; U1.47 1577.54,1288.17 ; C4.2 1607.28,1339.57 v1(1631.89,1339.57) ; C23.2 1601.38,646.65 v1(1644.69,646.65) ; C12.2 1830.71,784.45 v1(1882.87,784.45) ; C13.2 v1(1938.98,1026.57) ; C9.2 1899.61,1097.44 v1(1939.96,1097.44) ; C14.2 1900.01,1275.01 v1(1950.39,1275.01) ; C19.2 1898.62,1338.58 v1(1953.74,1338.58) ; v1(1967.85,130.97) 1967.85,184.38 R4.1 ; C38.2 v1(2412.4,1664.37) ; v1(2443.01,1740.06) 2443.01,1786.51 2476.38,1819.88 U5.2 ; U6.1 2652.56,1601.18 v1(2652.56,1562.01) 2770.67,1562.01 R10.2 ; v1(2707.68,1739.17) C26.2@2707.68,1786.42
  Top Layer w10: 1577.54,1288.17 1584.83,1295.46 1584.83,1315.58 C4.2@1592.56,1323.31 ; C6.2@1593.54,1393.31 1607.24,1379.61 1630.24,1379.61 v1(1631.89,1377.95)
  Top Layer w11.81: C7.2 v1(396.65,2433.07) ; v1(407.48,2537.4) C8.1
  Top Layer w15.75: v1(465.36,1731.85) C2.2@540.44,1731.85 ; C1.2@725.12,2349.41 726.1,2348.43 v1(801.18,2348.43) ; v1(742.13,2228.72) 742.13,2158.1 U2.1
  Top Layer w19.68: v1(1651.57,1244.09) C5.2@1688.48,1281
  Top Layer w23.62: C5.2@1688.48,1281 C5.2@1688.48,1281.59
  Bottom Layer w7.87: U7.11 705.41,1014.27 757.38,1014.27 v1(758.86,1015.75)
  other v1: 1429.13,1030.51 1482.72,1030.51 1536.42,1030.51 1429.13,1082.25 1482.72,1082.25 1536.42,1082.25 1429.13,1137.8 1481.74,1137.8 1536.42,1137.8 4.92,2189.96
GPIO10: J3.1 U1.14 | length 925
  Top Layer w7.87: J3.1 950.79,615.16 1325.24,989.61 U1.14
GPIO11: J3.3 U1.15 | length 860.9
  Top Layer w7.87: J3.3 1050.79,677.42 1337.1,963.73 1337.1,973.86 U1.15
GPIO12: J3.5 U1.16 | length 805.3
  Top Layer w7.87: J3.5 1150.79,737.8 1361.26,948.27 U1.16
GPIO13: J3.7 U1.17 | length 809.6
  Top Layer w7.87: J3.7 1195.87,296.65 1195.87,740.16 1379.09,923.39 1379.88,923.39 1388.57,932.07 U1.17
GPIO14: J3.9 U1.18 | length 829.3
  Top Layer w7.87: J3.9 1229.33,363.19 1229.33,748.03 1404.31,923.02 U1.18
GPIO15: J3.11 U1.19 | length 877.9
  Top Layer w7.87: v1(1390.75,875) 1420.06,904.31 U1.19
  Bottom Layer w7.87: v1(1390.75,875) 1263.78,748.03 1263.78,378.94 1349.41,293.31 1399.21,293.31 J3.11
GPIO16: J3.13 U1.27 | length 1105.9
  Top Layer w7.87: U1.27 1546.05,910.65 1738.19,718.5 1814.96,718.5 1847.44,686.02 1847.44,356.3 1816.93,325.79 1634.84,325.79 J3.13
GPIO17: J3.15 U1.28 | length 1041.1
  Top Layer w7.87: U1.28 1561.8,914.58 1742.13,734.25 1830.71,734.25 1871.06,693.9 1871.06,353.84 1817.71,300.49 1709.55,300.49 J3.15
GPIO18: J3.17 U1.29 | length 975.5
  Top Layer w7.87: U1.29 1577.54,918.52 1748.03,748.03 1849.41,748.03 1894.69,702.76 1894.69,353.88 1793.85,253.05 1762.1,253.05 J3.17
GPIO19: J3.19 U1.31 | length 958.4
  Top Layer w7.87: U1.31 1636.38,973.86 1775.59,834.65 1878.94,834.65 v1(1881.89,837.6)
  Bottom Layer w7.87: J3.19 1915.35,306.3 1915.35,804.13 v1(1881.89,837.6)
INT0_1(1V8): ToF1.6 U8.3 | length 445.2
  Bottom Layer w7.87: U8.3@2226.97,1012.8 2231.1,1016.93 2281.69,1016.93 2298.23,1033.46 2298.23,1169.29 2437.99,1309.05 ToF1.6
INT0_1(3V3): U1.40 U8.18 | length 512.4
  Top Layer w7.87: U1.40 1745.69,1115.59 1761,1130.91 v1(1763.78,1130.91)
  Bottom Layer w7.87: v1(1763.78,1130.91) 1767.32,1130.91 1778.15,1141.73 1927.17,1141.73 1964.57,1104.33 1964.57,1030.51 1982.28,1012.8 U8.18@2023.82,1012.8
INT0_2(1V8): ToF2.6 U8.5 | length 272.5
  Bottom Layer w7.87: U8.5@2249.8,961.61 2390.75,961.61 2437.99,1008.86 ToF2.6
INT0_2(3V3): U1.36 U8.16 | length 435.7
  Top Layer w7.87: U1.36 1699.37,1052.6 v1(1786.42,965.55)
  Bottom Layer w7.87: v1(1786.42,965.55) 1790.68,965.55 1794.62,961.61 U8.16
INT0_3(1V8): ToF3.6 U8.7 | length 256.2
  Bottom Layer w7.87: U8.7@2249.8,910.43 2375.98,910.43 2436.7,849.72 ToF3.6
INT0_3(3V3): U1.34 U8.14 | length 443.9
  Top Layer w7.87: U1.34 1671.74,1021.1 1782.42,910.42 1793.3,910.42 v1(1812.99,910.43)
  Bottom Layer w7.87: v1(1812.99,910.43) U8.14
INT0_4(1V8): ToF4.6 U8.9 | length 577.9
  Bottom Layer w7.87: U8.9 2201.77,859.25 2170.28,827.76 2170.28,688.98 2214.92,644.34 2372.4,644.34 2436.7,580.03 ToF4.6
INT0_4(3V3): U1.32 U8.12 | length 452.9
  Top Layer w7.87: U1.32 1652.13,989.61 1783.46,858.27 v1(1852.36,858.27)
  Bottom Layer w7.87: v1(1852.36,858.27) 1852.85,858.76 2016.44,858.76 U8.12
NetB1_1: R4.2 RESET.1 RESET.2 | length 398.9
  Top Layer w7.87: RESET.1 RESET.2 1969.49,250.98 R4.2@1972.44,248.03
NetC23_1: C23.1 R5.1 Y1.3 | length 250.7
  Top Layer w7.87: R5.1 1469.49,699.8 1529.53,639.76 1528.54,639.76 1521.65,632.87 1521.65,631.89 1501.97,612.2 1501.97,578.74 1504.27,576.43 1533.46,547.24 Y1.3
NetC38_1: C38.1 R7.2 U6.7 U6.8 | length 219.7
  Top Layer w7.87: R7.2@2298.23,1601.38 C38.1 ; C38.1@2373.03,1602.36 U6.8@2496.26,1602.36 ; U6.8 U6.7
NetF1_1: F1.1 J1.1 | length 738.1
  Top Layer w15.75: F1.1@669.29,2654.53 F1.1 946.85,2654.53 1103.35,2498.03 J1.1
NetFB1_1: FB1.1 J1.S1 J1.S2 Z1.1 Z2.1 | length 1662.9
  Top Layer w7.87: FB1.1 1031.15,3037.31 1041.43,3037.31 1154.72,2924.02 J1.S2 1314.96,2683.07 ; Z1.1 1316.54,2363 1329.7,2376.17 1332.46,2376.17 1383.86,2427.56 1383.86,2614.17 1314.96,2683.07 ; Z2.1 1612.2,2469.09 1612.2,2666.54 J1.S1 1314.96,2683.07
QSPI_SCLK: U1.56 U4.6 | length 820.2
  Top Layer w7.87: U4.6 1275.2,1760.43 1281.77,1753.87 1281.77,1752.68 1314.96,1719.49 1314.96,1662.4 1279.53,1626.97 1226.38,1626.97 1187.01,1587.6 1187.01,1404.53 1240.16,1351.38 1336.61,1351.38 1435.81,1252.18 U1.56
QSPI_SD0: U1.57 U4.5 | length 716.7
  Top Layer w7.87: U4.5 1217.32,1710.43 1164.37,1657.48 1164.37,1398.62 1226.38,1336.61 1328.74,1336.61 1420.06,1245.29 U1.57
QSPI_SD1: U1.59 U4.2 | length 885.4
  Top Layer w7.87: U4.2 949.2,1810.43 942.64,1803.87 923.23,1784.46 923.23,1578.74 1198.82,1303.15 1321.53,1303.15 1388.57,1236.12 U1.59
QSPI_SD2: U1.58 U4.3 | length 816.8
  Top Layer w7.87: U4.3 969.29,1759.84 1020.67,1759.84 1100.85,1679.66 1100.85,1431.63 1212.26,1320.22 1324.47,1320.22 1404.31,1240.37 U1.58
QSPI_SD3: U1.55 U4.7 | length 882.7
  Top Layer w7.87: U4.7@1250.55,1807.32 1254,1803.87 1283.73,1803.87 1343.5,1744.09 1343.5,1651.57 1295.28,1603.35 1243.11,1603.35 1206.69,1566.93 1206.69,1416.34 1253.94,1369.09 1340.55,1369.09 1451.56,1258.09 U1.55
QSPI_SS: J4.1 R6.2 U1.60 | length 1237.1
  Top Layer w7.87: J4.1 1178.15,1982.28 R6.2 1035.43,1982.28 898.62,1845.47 898.62,1573.82 1187.99,1284.45 1318.9,1284.45 1371.42,1231.93 1372.82,1231.93 U1.60
RUN: RESET.3 RESET.4 U1.26 | length 690.5
  Top Layer w7.87: U1.26 1530.3,908.3 1732.89,705.71 1772.86,705.71 1788.3,690.27 1788.3,649.69 RESET.4 RESET.3
SCL(1V8): R12.2 ToF1.3 ToF2.3 ToF3.3 ToF4.3 U6.3 | length 1447.9
  Top Layer w7.87: ToF4.3 2674.35,538.83 2674.35,805.55 2674.35,1073.62 2674.35,1340.34 ToF1.3 2611.22,1404.76 2611.22,1644.54 2617.99,1651.3 2649.14,1651.3 U6.3 2733.27,1653.54 2849.41,1769.69 R12.2
SCL(3V3): R9.2 U1.43 U6.6 | length 1522.3
  Top Layer w7.87: U1.43 1657.91,1162.83 1723.43,1228.35 2019.68,1228.35 2349.41,1558.07 2429.13,1558.07 ; R9.2@2285.43,1803.15 2286.42,1803.15 R9.2@2302.17,1787.4 ; R9.2@2302.17,1786.42 R9.2@2302.17,1787.4 ; R9.2 R9.2@2302.17,1787.4 ; 2424.21,1558.07 2534.45,1558.07 2558.07,1581.69 2558.07,1629.2 2537.67,1649.61 2515.94,1649.61 U6.6 ; U6.6@2504.72,1654.13 2458.07,1654.13 2408.46,1703.74 2365.16,1703.74 2302.47,1766.42 2302.47,1787.09 R9.2@2302.17,1787.4
SDA(1V8): R11.2 ToF1.4 ToF2.4 ToF3.4 ToF4.4 U6.4 | length 1373.8
  Top Layer w7.87: ToF4.4 2595.35,538.83 2595.35,805.55 2595.35,1073.62 2595.35,1340.34 ToF1.4 2595.99,1658.98 2612.2,1675.2 2647.44,1675.2 U6.4 2690.94,1679.13 2778.23,1766.42 2778.23,1777.56 2780.7,1780.02 R11.2@2791.83,1780.02
SDA(3V3): R8.2 U1.42 U6.5 | length 1494.6
  Top Layer w7.87: U1.42 1691.38,1147.09 1745.08,1200.79 2035.43,1200.79 2366.14,1531.5 2539.37,1531.5 2573.82,1565.94 2573.82,1660.02 2554.71,1679.13 U6.5 ; R8.2 2373.34,1793.98 2373.34,1766.42 2460.63,1679.13 U6.5@2511.5,1679.13
SWCLK: J3.6 U1.24 | length 1348.8
  Top Layer w7.87: J3.6 1206.89,197.83 1382.87,197.83 1400.75,215.71 1400.75,259.01 1491.14,349.41 1671.26,349.41 1717.52,395.67 1717.52,675.91 1558.79,834.65 1544.59,834.65 1515.75,863.49 1515.75,863.88 1498.8,880.82 U1.24
SWD: J3.8 U1.25 | length 1259.1
  Top Layer w7.87: U1.25 1514.55,893.91 v1(1532.55,875.91)
  Bottom Layer w7.87: J3.8 1297.67,188.62 1457.58,188.62 1500,231.04 1500,279.53 1555.12,334.65 1676.18,334.65 1730.32,388.78 1730.32,678.15 v1(1532.55,875.91)
TRIG_1(3V3): U1.4 U7.4 | length 442.1
  Top Layer w7.87: v1(1175.2,1173.23) 1175.2,1170.94 1199.05,1147.09 U1.4
  Bottom Layer w7.87: U7.4 988.19,1166.34 1006.89,1185.04 1159.76,1185.04 1171.57,1173.23 v1(1175.2,1173.23)
TRIG_1(5V): U7.17 US1.2 | length 605.3
  Bottom Layer w7.87: US1.2 190.12,1357.28 383.96,1163.45 701.04,1163.45 U7.17
TRIG_2(3V3): U1.2 U7.1 | length 444
  Top Layer w7.87: v1(1236.7,1197.81) 1255.93,1178.58 U1.2
  Bottom Layer w7.87: U7.1 987.2,1243.11 1002.95,1227.36 1207.15,1227.36 v1(1236.7,1197.81)
TRIG_2(5V): U7.20 US2.2 | length 248.3
  Bottom Layer w7.87: US2.2 566.93,1357.28 681.1,1243.11 U7.20
TRIG_3(3V3): U1.7 U7.6 | length 440.7
  Top Layer w7.87: v1(1154.5,1080.68) 1155.21,1080.68 1174.37,1099.84 U1.7@1348.43,1099.84
  Bottom Layer w7.87: U7.6 978.35,1115.16 1012.82,1080.68 v1(1154.5,1080.68)
TRIG_3(5V): U7.15 US3.2 | length 625.7
  Bottom Layer w7.87: US3.2 199.8,869.09 445.87,1115.16 U7.15
TRIG_4(3V3): U1.9 U7.8 | length 438.7
  Top Layer w7.87: v1(1206.69,1047.24) 1210.75,1047.24 1231.85,1068.35 U1.9
  Bottom Layer w7.87: U7.8 971.46,1063.98 995.08,1040.35 1195.54,1040.35 1202.43,1047.24 v1(1206.69,1047.24)
TRIG_4(5V): U7.13 US4.2 | length 318.7
  Bottom Layer w7.87: US4.2 512.95,869.09 583.46,939.6 583.46,1002.75 644.69,1063.98 U7.13
U\S\B\_\B\O\O\T\: BOOT.3 BOOT.4 R6.1 | length 378.7
  Top Layer w7.87: BOOT.4@969.18,2085.32 BOOT.4@974.26,2090.4 ; R6.1@974.41,1982.28 974.41,2025.59 974.26,2025.44 BOOT.4@974.26,2090.4 ; BOOT.3 BOOT.4 BOOT.4@974.26,2090.4
UART1_RX: P2.2 U1.13 | length 1166.6
  Top Layer w7.87: P2.2 708.66,330.71 874.02,496.06 874.02,582.68 1293.82,1002.48 1332.35,1002.48 1335.22,1005.35 U1.13
UART1_TX: P2.1 U1.12 | length 1090.7
  Top Layer w7.87: P2.1 602.36,409.45 661.42,468.5 ; 660.43,468.5 1107.28,915.35 1176.68,915.35 1282.42,1021.1 U1.12
USB_GND: FB1.2 J1.4 J2.1 | length 683.2
  Top Layer w7.87: FB1.2 1016.73,2981.73 J2.1 1062.99,2833.86 1062.99,2629.92 1127.38,2565.54 1314.13,2565.54 1316.26,2567.67 1333.42,2567.67 J1.4
USB_VCC: C8.2 F1.2 U9.3 | length 321.8
  Top Layer w15.75: U9.3@239.32,2622.52 278.21,2661.42 C8.2 408.1,2660.8 484.25,2660.8 505.91,2639.15 F1.2@505.91,2609.25
VREG_AVDD: C5.1 R1.2 U1.46 | length 251.8
  Top Layer w7.87: U1.46 1593.29,1245.23 1674.21,1326.15 1674.21,1330.71 C5.1 R1.2@1688.98,1432.09
VREG_LX: L1.2 U1.48 | length 261.6
  Top Layer w8: U1.48 1561.8,1290.31
  Top Layer w10: 1561.8,1290.31 1561.8,1414.37 1600.92,1453.5 L1.2@1600.92,1465.31
X\S\H\U\T\1\(1V8): ToF1.5 U8.1 | length 498.7
  Bottom Layer w7.87: U8.1@2249.8,1063.98 2249.8,1152.36 2393.7,1296.26 2393.7,1356.3 2414.37,1376.97 2481.01,1376.97 ToF1.5
X\S\H\U\T\1\(3V3): U1.41 U8.20 | length 472.9
  Top Layer w7.87: U1.41 1717.5,1131.34 v1(1740.87,1154.71)
  Bottom Layer w7.87: v1(1740.87,1154.71) 1743,1154.71 1750.7,1162.4 1949.8,1162.4 2023.82,1088.39 U8.20@2023.82,1063.98
X\S\H\U\T\2\(1V8): ToF2.5 U8.4 | length 383.9
  Bottom Layer w7.87: U8.4@2249.8,987.2 2379.92,987.2 2396.65,1003.94 2396.65,1084.65 2426.18,1114.17 2476.44,1114.17 ToF2.5
X\S\H\U\T\2\(3V3): U1.37 U8.17 | length 431.7
  Top Layer w7.87: U1.37 1708.59,1068.35 1774.63,1002.31 v1(1778.89,1002.31)
  Bottom Layer w7.87: v1(1778.89,1002.31) 1793.99,987.2 U8.17
X\S\H\U\T\3\(1V8): ToF3.5 U8.6 | length 344.5
  Bottom Layer w7.87: U8.6@2249.8,936.02 2427.17,936.02 2495.96,867.23 2495.96,827.81 2515.7,808.06 ToF3.5
X\S\H\U\T\3\(3V3): U1.35 U8.15 | length 439.8
  Top Layer w7.87: U1.35 1678.7,1036.85 1779.53,936.02 v1(1800.2,936.02)
  Bottom Layer w7.87: v1(1800.2,936.02) U8.15
X\S\H\U\T\4\(1V8): ToF4.5 U8.8 | length 772.6
  Bottom Layer w7.87: U8.8@2237.99,886.61 2175.98,886.61 2138.78,849.41 2138.78,674.21 2205.71,607.28 2344.49,607.28 2395.67,556.1 2395.67,521.46 2414.18,502.95 2480.46,502.95 ToF4.5
X\S\H\U\T\4\(3V3): U1.33 U8.13 | length 453.7
  Top Layer w7.87: U1.33 1660,1005.35 1787.46,877.89 1819.82,877.89 v1(1822.83,880.91)
  Bottom Layer w7.87: v1(1822.83,880.91) 1824.8,882.87 2014.96,882.87 U8.13
XIN: C22.1 U1.21 Y1.1 | length 514.3
  Top Layer w7.87: Y1.1 1452.76,478.35 1469.49,495.08 1469.49,500 1484.25,514.76 1484.25,611.71 1463.09,632.87 1461.61,632.87 1437.01,657.48 1437.01,826.62 1451.56,841.17 U1.21
XOUT: R5.2 U1.22 | length 143.1
  Top Layer w7.87: R5.2@1467.31,808.28 U1.22
  Top Layer w10: R5.2@1467.31,808.28 R5.2
pads on no net: U3.1 U3.2 U3.3 U5.4

## Polygon pours and split planes (outlines as drawn)
3V3 on Top Layer "T.3V3-2" (solid, remove dead copper, pour order 13): -121.97,-110.32 cw(c-36.61,-24.96) -157.32,-24.96 -157.32,3004.96 cw(c-36.61,3004.96) -121.97,3090.32 -113.94,3098.35 cw(c-28.59,3012.99) -28.58,3133.7 2753.76,3133.7 cw(c2771.44,2942.91) 2893.86,3090.32 cw(c2811.95,2996.68) 2936.08,3004.96 2936.08,-24.24 cw(c2765.88,-1.3) 2870,-137.87 cw(c2798.46,-19.19) 2765.12,-153.7 -28.58,-153.7 cw(c-28.58,-32.99) -113.94,-118.35
5V on Top Layer "T.5V" (solid, pour order 12): -157.48,872.11 149.78,870.82 507.87,870.82 599.16,871.06 666.09,937.99 666.09,1468.04 417.32,1718.42 417.32,1895.67 577.76,2056.1 577.76,2427.66 354.08,2651.33 -157.48,2651.33
GND on Top Layer "T.GND-1" (solid, pour order 10): 1638.78,704.72 1677.17,666.34 1677.17,381.89 1303.15,381.89 1303.15,667.42 1336.49,704.72
3V3 on Top Layer "T.3V3-1" (solid, pour order 11): 1671.26,903.54 1288.39,903.54 1288.39,1278.54 1671.26,1278.54
1V1 on Top Layer "T.1V1-1" (solid, pour order 9): 1397.64,1169.29 1570.87,1169.29 1570.87,996.06 1397.64,996.06
GND on Bottom Layer "B.GND-1" (solid, remove dead copper, pour order 14): -122.12,-114.1 cw(c-36.77,-28.74) -157.48,-28.74 -157.48,3001.18 cw(c-36.77,3001.18) -122.12,3086.54 -114.1,3094.57 cw(c-28.74,3009.21) -28.74,3129.92 2833.92,3129.92 cw(c2834.43,3126.73) 2836.33,3129.34 cw(c2785.84,2991.96) 2931.94,3000.82 2931.57,-28.74 cw(c2800.41,-27.27) 2892.11,-121.07 2871.06,-137.8 cw(c2794.25,-19.57) 2764.96,-157.48 -28.74,-157.48 cw(c-28.74,-36.77) -114.1,-122.12

## Keep-outs
Keep-Out Layer:
  lines w19.68: -39.37,-157.48 2814.96,-157.48 ; -28.74,-157.48 cw(c-28.74,-36.77) -114.1,-122.12 -122.12,-114.1 cw(c-36.77,-28.74) -157.48,-28.74 -157.48,3001.18 cw(c-36.77,3001.18) -122.12,3086.54 -114.1,3094.57 cw(c-28.74,3009.21) -28.74,3129.92 2792.98,3129.92 cw(c2792.98,2981.8) 2897.72,3086.54 cw(c2812.36,3001.18) 2933.07,3001.18 ; 2804.33,-157.48 ccw(c2804.33,-36.77) 2889.69,-122.12 ccw(c2784.95,-17.38) 2933.07,-17.38 2933.07,3011.81

## Silkscreen, mask and mechanical layers (free items; w line width, h text height)
Top Overlay:
  drawing of 56 lines, arcs and shapes, not listed
  text "Distance Sensor Board [v3]" at 1653.7,2998.19 h40
  text "2/23/2026" at 2271.81,2935.2 h40
  text "Aiden Shepler" at 1654.69,2932.78 h40
  text "Power" at 594.61,2763.91 h35
  text "MCU & Peripherals" at 2109.23,2599.28 h35 r270
  text "+" at 464.72,2330.94 h35
  text "5V" at -74.68,1898.75 h35
  text "Time of Flight Sensors" at 2156.47,1884.72 h35 r270
  text "GND" at -94.36,1812.13 h35
  text "+" at 788.54,1715.78 h35
  text "Ultrasonic Sensors" at 161.54,1547.37 h35
  text "5V" at -79.02,1425.42 h35
  text "TRIG" at -112.08,1347.57 h35
  text "ECHO" at -108.14,1268.83 h35
  text "GND" at -96.52,1189.2 h35
  text "pTX" at -73.88,399.75 h35
  text "XSHUT" at 2499.5,385.44 h35 r270
  text "SDA" at 2577.88,384.72 h35 r270
  text "SCL" at 2660.56,384.72 h35 r270
  text "INT0" at 2420.5,365.03 h35 r270
  text "GND" at 2735.5,350.45 h35 r270
  text "1V8" at 2342.5,347.54 h35 r270
  text "5V" at 2814.5,332.96 h35 r270
  text "pRX" at -73.88,321.01 h35
  text "GND" at -73.88,236.44 h35
  text "1V8" at 2537.48,135.91 h20
  text "GPIO10" at 896.73,26.65 h20
  text "11" at 1039.12,24.69 h20
  text "12" at 1135.79,22.45 h20
  text "13" at 1235.79,18.52 h20
  text "14" at 1335.79,18.52 h20
  text "15" at 1435.79,18.52 h20
  text "16" at 1535.79,18.52 h20
  text "17" at 1635.79,18.52 h20
  text "18" at 1735.79,18.52 h20
  text "GPIO19" at 1797.47,16.81 h20
  text "GND" at 1724.13,-38.31 h20
  text "3V3" at 924.24,-42.19 h20 r0.58
  text "SWD" at 1224.13,-42.24 h20
  text "GND" at 1324.13,-42.24 h20
  text "GND" at 1424.13,-42.24 h20
  text "GND" at 1524.13,-42.24 h20
  text "GND" at 1624.13,-42.24 h20
  text "GND" at 1824.13,-42.24 h20
  text "3V3" at 1022.67,-43.18 h20 r0.58
  text "SWCLK" at 1102.44,-43.23 h20
Bottom Overlay:
  drawing of 10 lines, arcs and shapes, not listed
  text "(70.5mm MH to MH) 79mm" at 861.09,3047.37 h35
  text "2.54mm" at 355.19,2870.2 h35
  text "(75.5mm MH to MH) 83.5mm" at -102.24,2040.48 h35 r270